# Altium PCB imprimir.PcbDoc (part 2 of 4)
Units mm, origin at the board's own origin, x right, y up, seen from the top; angles counter-clockwise.
Board outline 196.72 x 221.49 mm, 2 copper layers (Top Layer, Bottom Layer); 172 components, 0 nets, 904 pads, 232 vias.
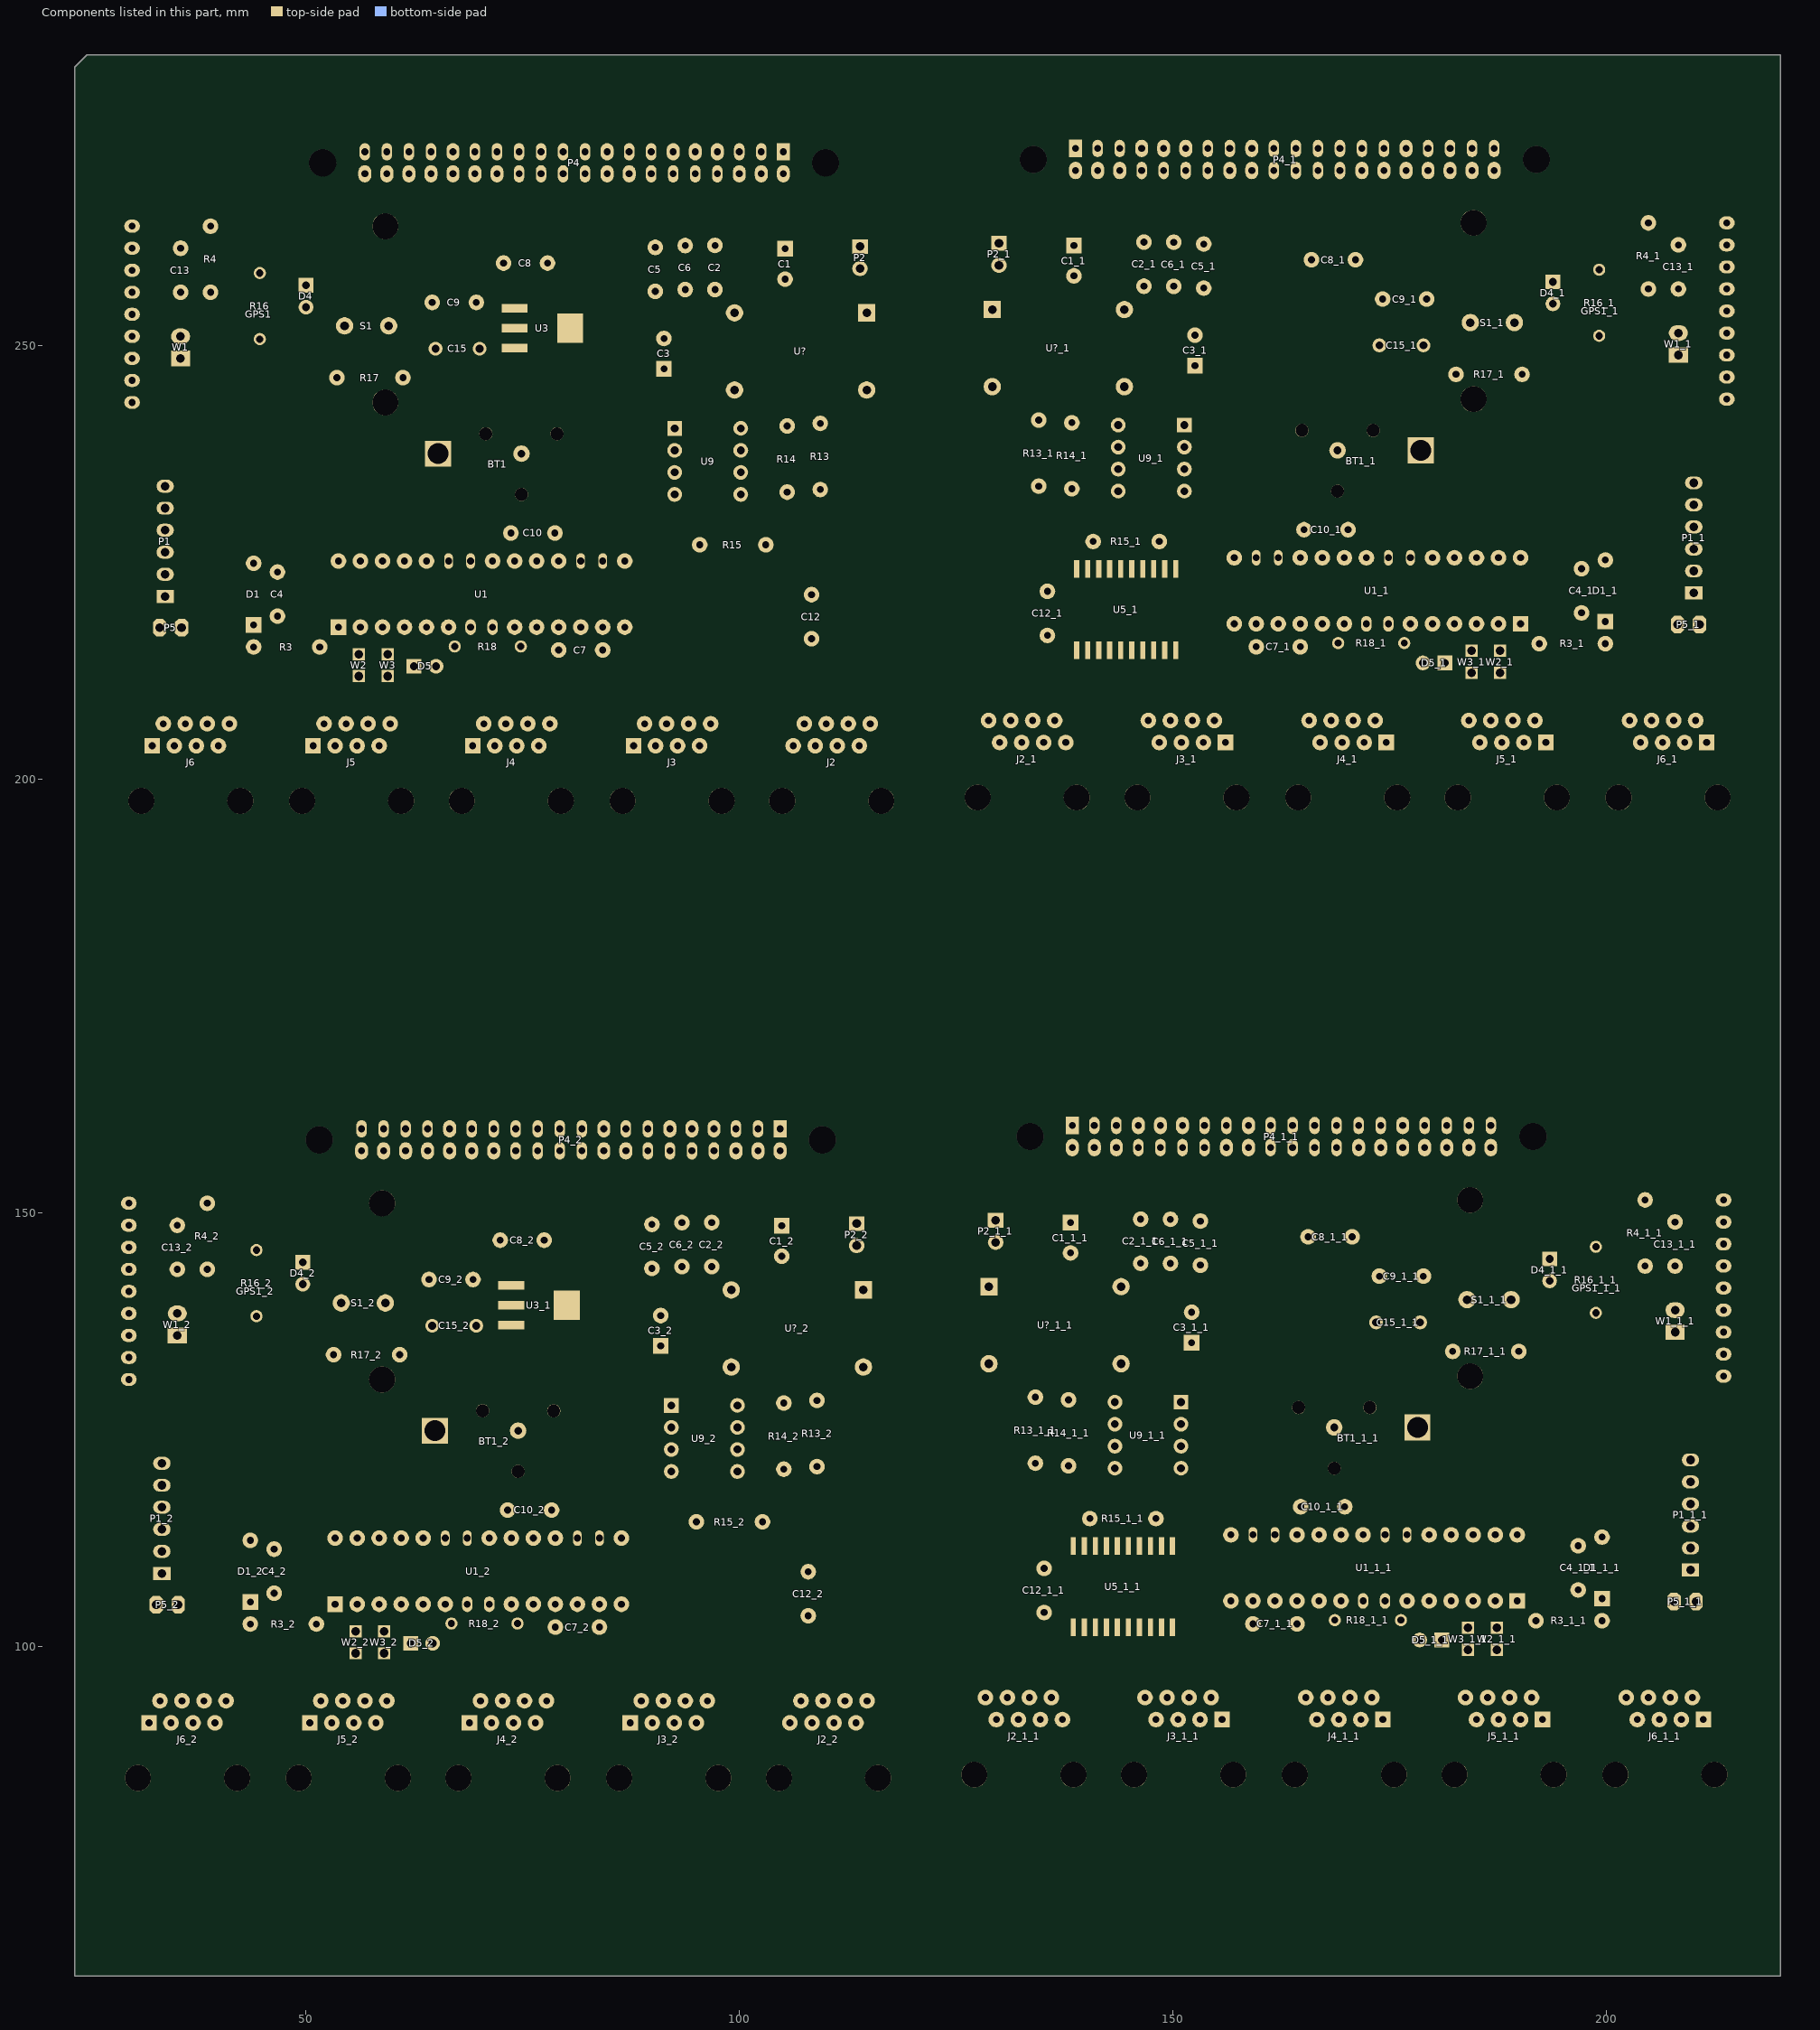
[diagram p2: the components of this part, seen from the top]

## Via types
v1: diameter 1.6, hole 0.6, Top Layer to Bottom Layer, 232 vias

## Nets (pads, with @x,y where several pads share a name; then routed paths per layer and width w, separated by ;. In a path a pad name is that pad's centre, name@x,y a point inside that pad or via, vN(x,y) a via of type N, cw(c..) or ccw(c..) an arc to the next point about the centre after c; other vN are vias at no path point) (continued)
copper on no net: (continued)
  Top Layer w0.025: 91.415,105.207 92.989,105.207 ; 91.415,105.232 92.989,105.232 ; 91.415,105.258 92.989,105.258 ; 91.415,105.283 92.989,105.283 ; 91.415,105.308 92.989,105.308 ; 91.415,105.334 92.989,105.334 ; 91.415,105.359 92.989,105.359 ; 91.415,105.385 92.989,105.385 ; 91.415,105.41 92.989,105.41 ; 91.415,105.435 92.989,105.435 ; 91.415,105.461 92.989,105.461 ; 91.415,105.486 91.618,105.486 ; 91.415,105.512 91.592,105.512 ; 91.415,105.537 91.592,105.537 ; 91.415,105.562 91.592,105.562 ; 91.415,105.588 91.592,105.588 ; 91.415,105.613 92.989,105.613 ; 91.415,105.639 91.923,105.639 ; 91.415,105.664 91.897,105.664 ; 91.415,109.347 91.44,109.347 ; 91.415,109.372 91.44,109.372 ; 91.415,109.398 91.44,109.398 ; 91.415,109.423 91.44,109.423 ; 91.415,109.449 91.465,109.449 ; 91.415,109.474 91.44,109.474 ; 91.415,109.499 91.44,109.499 ; 91.415,109.525 94.361,109.525 ; 91.415,109.55 94.361,109.55 ; 91.415,109.576 95.707,109.576 ; 91.415,109.601 95.707,109.601 ; 91.415,109.626 95.682,109.626 ; 91.415,109.652 95.656,109.652 ; 91.415,109.677 95.631,109.677 ; 91.415,109.703 95.606,109.703 ; 91.415,109.728 95.58,109.728 ; 91.415,109.753 95.555,109.753 ; 91.415,109.779 95.529,109.779 ; 91.415,109.804 95.504,109.804 ; 91.415,109.83 95.453,109.83 ; 91.415,109.855 95.428,109.855 ; 91.415,109.88 95.402,109.88 ; 91.415,109.906 95.352,109.906 ; 91.415,109.931 95.301,109.931 ; 91.415,109.957 95.25,109.957 ; 91.415,109.982 95.199,109.982 ; 91.415,110.007 95.148,110.007 ; 91.415,110.033 95.072,110.033 ; 91.415,110.058 94.996,110.058 ; 91.415,110.084 94.869,110.084 ; 91.415,110.109 94.793,110.109 ; 91.415,110.134 94.59,110.134 ; 91.415,110.16 94.386,110.16 ; 91.465,105.689 91.897,105.689 ; 91.491,105.715 91.923,105.715 ; 91.491,109.449 91.592,109.449 ; 91.491,109.474 91.592,109.474 ; 91.491,109.499 91.745,109.499 ; 91.516,105.74 91.923,105.74 ; 91.516,109.372 91.592,109.372 ; 91.516,109.398 91.592,109.398 ; 91.516,109.423 91.592,109.423 ; 91.567,105.766 91.897,105.766 ; 91.567,106.096 91.745,106.096 ; 91.567,106.121 91.77,106.121 ; 91.592,105.918 91.745,105.918 ; 91.592,105.943 91.745,105.943 ; 91.592,106.147 91.77,106.147 ; 91.618,105.588 92.989,105.588 ; 91.618,105.791 91.897,105.791 ; 91.618,106.07 91.745,106.07 ; 91.618,106.172 91.745,106.172 ; 91.618,109.423 91.719,109.423 ; 91.618,109.449 91.745,109.449 ; 91.618,109.474 91.745,109.474 ; 91.643,105.486 92.989,105.486 ; 91.643,105.512 92.989,105.512 ; 91.643,105.537 92.989,105.537 ; 91.643,105.562 92.989,105.562 ; 91.643,105.816 91.872,105.816 ; 91.643,105.842 91.745,105.842 ; 91.643,105.867 91.77,105.867 ; 91.643,105.893 91.77,105.893 ; 91.643,105.969 91.77,105.969 ; 91.643,105.994 91.77,105.994 ; 91.643,106.02 91.77,106.02 ; 91.643,106.045 91.745,106.045 ; 91.643,108.966 91.77,108.966 ; 91.643,108.991 91.77,108.991 ; 91.643,109.017 91.745,109.017 ; 91.643,109.042 91.745,109.042 ; 91.643,109.068 91.77,109.068 ; 91.643,109.093 91.77,109.093 ; 91.643,109.118 91.745,109.118 ; 91.643,109.144 91.745,109.144 ; 91.643,109.169 91.77,109.169 ; 91.643,109.195 91.77,109.195 ; 91.643,109.22 91.77,109.22 ; 91.643,109.245 91.77,109.245 ; 91.643,109.271 91.77,109.271 ; 91.643,109.296 91.745,109.296 ; 91.643,109.322 91.745,109.322 ; 91.643,109.347 92.532,109.347 ; 91.643,109.372 91.745,109.372 ; 91.643,109.398 91.719,109.398 ; 91.669,106.197 91.694,106.197 ; 91.669,108.915 91.694,108.915 ; 91.669,108.941 91.745,108.941 ; 91.77,105.842 91.821,105.842 ; 91.77,109.296 91.821,109.296 ; 91.77,109.322 91.872,109.322 ; 91.77,109.372 92.532,109.372 ; 91.77,109.398 92.532,109.398 ; 91.796,109.423 92.354,109.423 ; 91.796,109.449 92.354,109.449 ; 91.796,109.474 92.989,109.474 ; 91.796,109.499 93.37,109.499 ; 91.796,217.856 93.37,217.856 ; 91.796,217.881 93.37,217.881 ; 91.796,217.907 93.37,217.907 ; 91.796,217.932 93.37,217.932 ; 91.796,217.957 93.37,217.957 ; 91.796,217.983 93.37,217.983 ; 91.796,218.008 93.37,218.008 ; 91.796,218.034 93.37,218.034 ; 91.796,218.059 93.37,218.059 ; 91.796,218.084 93.37,218.084 ; 91.796,218.11 93.37,218.11 ; 91.796,218.135 91.999,218.135 ; 91.796,218.161 91.973,218.161 ; 91.796,218.186 91.973,218.186 ; 91.796,218.211 91.973,218.211 ; 91.796,218.237 91.973,218.237 ; 91.796,218.262 93.37,218.262 ; 91.796,218.288 92.304,218.288 ; 91.796,218.313 92.278,218.313 ; 91.796,221.996 91.821,221.996 ; 91.796,222.021 91.821,222.021 ; 91.796,222.047 91.821,222.047 ; 91.796,222.072 91.821,222.072 ; 91.796,222.098 91.846,222.098 ; 91.796,222.123 91.821,222.123 ; 91.796,222.148 91.821,222.148 ; 91.796,222.174 94.742,222.174 ; 91.796,222.199 94.742,222.199 ; 91.796,222.225 96.088,222.225 ; 91.796,222.25 96.088,222.25 ; 91.796,222.275 96.063,222.275 ; 91.796,222.301 96.037,222.301 ; 91.796,222.326 96.012,222.326 ; 91.796,222.352 95.987,222.352 ; 91.796,222.377 95.961,222.377 ; 91.796,222.402 95.936,222.402 ; 91.796,222.428 95.91,222.428 ; 91.796,222.453 95.885,222.453 ; 91.796,222.479 95.834,222.479 ; 91.796,222.504 95.809,222.504 ; 91.796,222.529 95.783,222.529 ; 91.796,222.555 95.733,222.555 ; 91.796,222.58 95.682,222.58 ; 91.796,222.606 95.631,222.606 ; 91.796,222.631 95.58,222.631 ; 91.796,222.656 95.529,222.656 ; 91.796,222.682 95.453,222.682 ; 91.796,222.707 95.377,222.707 ; 91.796,222.733 95.25,222.733 ; 91.796,222.758 95.174,222.758 ; 91.796,222.783 94.971,222.783 ; 91.796,222.809 94.767,222.809 ; 91.846,218.338 92.278,218.338 ; 91.872,218.364 92.304,218.364 ; 91.872,222.098 91.973,222.098 ; 91.872,222.123 91.973,222.123 ; 91.872,222.148 92.126,222.148 ; 91.897,109.296 92.532,109.296 ; 91.897,109.322 92.532,109.322 ; 91.897,218.389 92.304,218.389 ; 91.897,222.021 91.973,222.021 ; 91.897,222.047 91.973,222.047 ; 91.897,222.072 91.973,222.072 ; 91.923,109.271 92.024,109.271 ; 91.948,105.639 92.913,105.639 ; 91.948,105.664 92.532,105.664 ; 91.948,105.689 92.532,105.689 ; 91.948,105.715 92.532,105.715 ; 91.948,109.042 92.329,109.042 ; 91.948,109.068 92.329,109.068 ; 91.948,109.093 92.329,109.093 ; 91.948,218.415 92.278,218.415 ; 91.948,218.745 92.126,218.745 ; 91.948,218.77 92.151,218.77 ; 91.973,105.74 92.532,105.74 ; 91.973,218.567 92.126,218.567 ; 91.973,218.592 92.126,218.592 ; 91.973,218.796 92.151,218.796 ; 91.999,109.017 92.329,109.017 ; 91.999,218.237 93.37,218.237 ; 91.999,218.44 92.278,218.44 ; 91.999,218.719 92.126,218.719 ; 91.999,218.821 92.126,218.821 ; 91.999,222.072 92.1,222.072 ; 91.999,222.098 92.126,222.098 ; 91.999,222.123 92.126,222.123 ; 92.024,105.766 92.38,105.766 ; 92.024,108.991 92.329,108.991 ; 92.024,218.135 93.37,218.135 ; 92.024,218.161 93.37,218.161 ; 92.024,218.186 93.37,218.186 ; 92.024,218.211 93.37,218.211 ; 92.024,218.465 92.253,218.465 ; 92.024,218.491 92.126,218.491 ; 92.024,218.516 92.151,218.516 ; 92.024,218.542 92.151,218.542 ; 92.024,218.618 92.151,218.618 ; 92.024,218.643 92.151,218.643 ; 92.024,218.669 92.151,218.669 ; 92.024,218.694 92.126,218.694 ; 92.024,221.615 92.151,221.615 ; 92.024,221.64 92.151,221.64 ; 92.024,221.666 92.126,221.666 ; 92.024,221.691 92.126,221.691 ; 92.024,221.717 92.151,221.717 ; 92.024,221.742 92.151,221.742 ; 92.024,221.767 92.126,221.767 ; 92.024,221.793 92.126,221.793 ; 92.024,221.818 92.151,221.818 ; 92.024,221.844 92.151,221.844 ; 92.024,221.869 92.151,221.869 ; 92.024,221.894 92.151,221.894 ; 92.024,221.92 92.151,221.92 ; 92.024,221.945 92.126,221.945 ; 92.024,221.971 92.126,221.971 ; 92.024,221.996 92.913,221.996 ; 92.024,222.021 92.126,222.021 ; 92.024,222.047 92.1,222.047 ; 92.05,105.791 92.151,105.791 ; 92.05,108.966 92.329,108.966 ; 92.05,109.118 92.329,109.118 ; 92.05,109.144 92.431,109.144 ; 92.05,109.169 92.431,109.169 ; 92.05,109.195 92.405,109.195 ; 92.05,109.22 92.38,109.22 ; 92.05,109.245 92.761,109.245 ; 92.05,109.271 92.532,109.271 ; 92.05,218.846 92.075,218.846 ; 92.05,221.564 92.075,221.564 ; 92.05,221.59 92.126,221.59 ; 92.075,105.816 92.1,105.816 ; 92.075,108.941 92.329,108.941 ; 92.1,108.788 92.354,108.788 ; 92.126,108.763 92.202,108.763 ; 92.126,108.915 92.329,108.915 ; 92.151,108.814 92.354,108.814 ; 92.151,218.491 92.202,218.491 ; 92.151,221.945 92.202,221.945 ; 92.151,221.971 92.253,221.971 ; 92.151,222.021 92.913,222.021 ; 92.151,222.047 92.913,222.047 ; 92.177,105.791 92.354,105.791 ; 92.177,105.816 92.329,105.816 ; 92.177,105.842 92.354,105.842 ; 92.177,105.867 92.532,105.867 ; 92.177,105.893 92.532,105.893 ; 92.177,108.839 92.354,108.839 ; 92.177,108.864 92.329,108.864 ; 92.177,108.89 92.329,108.89 ; 92.177,222.072 92.735,222.072 ; 92.177,222.098 92.735,222.098 ; 92.177,222.123 93.37,222.123 ; 92.177,222.148 93.751,222.148 ; 92.202,105.918 92.253,105.918 ; 92.202,108.712 92.329,108.712 ; 92.202,108.737 92.329,108.737 ; 92.227,108.687 92.304,108.687 ; 92.227,108.763 92.354,108.763 ; 92.253,108.661 92.278,108.661 ; 92.278,105.918 92.405,105.918 ; 92.278,221.945 92.913,221.945 ; 92.278,221.971 92.913,221.971 ; 92.304,105.943 92.405,105.943 ; 92.304,221.92 92.405,221.92 ; 92.329,218.288 93.294,218.288 ; 92.329,218.313 92.913,218.313 ; 92.329,218.338 92.913,218.338 ; 92.329,218.364 92.913,218.364 ; 92.329,221.691 92.71,221.691 ; 92.329,221.717 92.71,221.717 ; 92.329,221.742 92.71,221.742 ; 92.354,218.389 92.913,218.389 ; 92.38,105.842 92.405,105.842 ; 92.38,109.118 92.431,109.118 ; 92.38,221.666 92.71,221.666 ; 92.405,105.766 92.532,105.766 ; 92.405,109.423 92.507,109.423 ; 92.405,109.449 92.507,109.449 ; 92.405,218.415 92.761,218.415 ; 92.405,221.64 92.71,221.64 ; 92.431,105.791 92.532,105.791 ; 92.431,105.816 92.532,105.816 ; 92.431,105.842 92.532,105.842 ; 92.431,105.918 92.532,105.918 ; 92.431,105.943 92.532,105.943 ; 92.431,105.969 92.532,105.969 ; 92.431,105.994 92.532,105.994 ; 92.431,106.02 92.532,106.02 ; 92.431,109.22 92.532,109.22 ; 92.431,218.44 92.532,218.44 ; 92.431,221.615 92.71,221.615 ; 92.431,221.767 92.71,221.767 ; 92.431,221.793 92.812,221.793 ; 92.431,221.818 92.812,221.818 ; 92.431,221.844 92.786,221.844 ; 92.431,221.869 92.761,221.869 ; 92.431,221.894 93.142,221.894 ; 92.431,221.92 92.913,221.92 ; 92.456,106.045 92.532,106.045 ; 92.456,106.07 92.532,106.07 ; 92.456,109.195 92.507,109.195 ; 92.456,218.465 92.481,218.465 ; 92.456,221.59 92.71,221.59 ; 92.481,106.096 92.532,106.096 ; 92.481,106.121 92.532,106.121 ; 92.481,221.437 92.735,221.437 ; 92.507,221.412 92.583,221.412 ; 92.507,221.564 92.71,221.564 ; 92.532,221.463 92.735,221.463 ; 92.558,105.664 92.913,105.664 ; 92.558,108.61 92.659,108.61 ; 92.558,108.636 92.685,108.636 ; 92.558,108.661 92.685,108.661 ; 92.558,108.687 92.71,108.687 ; 92.558,108.763 92.71,108.763 ; 92.558,108.788 92.71,108.788 ; 92.558,109.271 92.786,109.271 ; 92.558,109.296 92.786,109.296 ; 92.558,109.322 92.812,109.322 ; 92.558,109.347 92.837,109.347 ; 92.558,109.372 92.862,109.372 ; 92.558,109.398 92.862,109.398 ; 92.558,109.423 92.862,109.423 ; 92.558,109.449 92.989,109.449 ; 92.558,218.44 92.735,218.44 ; 92.558,218.465 92.71,218.465 ; 92.558,218.491 92.735,218.491 ; 92.558,218.516 92.913,218.516 ; 92.558,218.542 92.913,218.542 ; 92.558,221.488 92.735,221.488 ; 92.558,221.513 92.71,221.513 ; 92.558,221.539 92.71,221.539 ; 92.583,105.689 92.913,105.689 ; 92.583,105.715 92.888,105.715 ; 92.583,108.712 92.71,108.712 ; 92.583,108.737 92.71,108.737 ; 92.583,108.814 92.735,108.814 ; 92.583,108.839 92.735,108.839 ; 92.583,108.864 92.735,108.864 ; 92.583,108.89 92.735,108.89 ; 92.583,108.915 92.735,108.915 ; 92.583,109.042 92.735,109.042 ; 92.583,109.068 92.735,109.068 ; 92.583,109.093 92.735,109.093 ; 92.583,109.118 92.735,109.118 ; 92.583,109.144 92.735,109.144 ; 92.583,109.169 92.735,109.169 ; 92.583,109.195 92.761,109.195 ; 92.583,109.22 92.761,109.22 ; 92.583,218.567 92.634,218.567 ; 92.583,221.361 92.71,221.361 ; 92.583,221.386 92.71,221.386 ; 92.608,105.74 92.913,105.74 ; 92.608,105.766 92.913,105.766 ; 92.608,105.791 92.913,105.791 ; 92.608,105.816 92.913,105.816 ; 92.608,105.842 92.913,105.842 ; 92.608,105.867 92.735,105.867 ; 92.608,105.893 92.735,105.893 ; 92.608,105.918 92.761,105.918 ; 92.608,105.943 92.761,105.943 ; 92.608,105.969 92.761,105.969 ; 92.608,105.994 92.761,105.994 ; 92.608,108.941 92.735,108.941 ; 92.608,108.966 92.735,108.966 ; 92.608,108.991 92.735,108.991 ; 92.608,109.017 92.735,109.017 ; 92.608,221.336 92.685,221.336 ; 92.608,221.412 92.735,221.412 ; 92.634,106.02 92.761,106.02 ; 92.634,106.045 92.735,106.045 ; 92.634,221.31 92.659,221.31 ; 92.659,218.567 92.786,218.567 ; 92.685,218.592 92.786,218.592 ; 92.761,105.867 92.913,105.867 ; 92.761,105.893 92.888,105.893 ; 92.761,218.491 92.786,218.491 ; 92.761,221.767 92.812,221.767 ; 92.786,105.918 92.862,105.918 ; 92.786,105.943 92.862,105.943 ; 92.786,218.415 92.913,218.415 ; 92.786,222.072 92.888,222.072 ; 92.786,222.098 92.888,222.098 ; 92.812,218.44 92.913,218.44 ; 92.812,218.465 92.913,218.465 ; 92.812,218.491 92.913,218.491 ; 92.812,218.567 92.913,218.567 ; 92.812,218.592 92.913,218.592 ; 92.812,218.618 92.913,218.618 ; 92.812,218.643 92.913,218.643 ; 92.812,218.669 92.913,218.669 ; 92.812,221.869 92.913,221.869 ; 92.837,218.694 92.913,218.694 ; 92.837,218.719 92.913,218.719 ; 92.837,221.844 92.888,221.844 ; 92.862,218.745 92.913,218.745 ; 92.862,218.77 92.913,218.77 ; 92.888,109.423 92.964,109.423 ; 92.939,218.313 93.294,218.313 ; 92.939,221.259 93.04,221.259 ; 92.939,221.285 93.066,221.285 ; 92.939,221.31 93.066,221.31 ; 92.939,221.336 93.091,221.336 ; 92.939,221.412 93.091,221.412 ; 92.939,221.437 93.091,221.437 ; 92.939,221.92 93.167,221.92 ; 92.939,221.945 93.167,221.945 ; 92.939,221.971 93.193,221.971 ; 92.939,221.996 93.218,221.996 ; 92.939,222.021 93.243,222.021 ; 92.939,222.047 93.243,222.047 ; 92.939,222.072 93.243,222.072 ; 92.939,222.098 93.37,222.098 ; 92.964,218.338 93.294,218.338 ; 92.964,218.364 93.269,218.364 ; 92.964,221.361 93.091,221.361 ; 92.964,221.386 93.091,221.386 ; 92.964,221.463 93.116,221.463 ; 92.964,221.488 93.116,221.488 ; 92.964,221.513 93.116,221.513 ; 92.964,221.539 93.116,221.539 ; 92.964,221.564 93.116,221.564 ; 92.964,221.691 93.116,221.691 ; 92.964,221.717 93.116,221.717 ; 92.964,221.742 93.116,221.742 ; 92.964,221.767 93.116,221.767 ; 92.964,221.793 93.116,221.793 ; 92.964,221.818 93.116,221.818 ; 92.964,221.844 93.142,221.844 ; 92.964,221.869 93.142,221.869 ; 92.989,108.026 93.929,108.026 ; 92.989,108.052 94.107,108.052 ; 92.989,108.077 94.183,108.077 ; 92.989,108.102 94.234,108.102 ; 92.989,108.128 94.285,108.128 ; 92.989,108.153 94.31,108.153 ; 92.989,108.179 94.336,108.179 ; 92.989,108.204 94.361,108.204 ; 92.989,108.229 94.386,108.229 ; 92.989,108.255 94.412,108.255 ; 92.989,108.28 94.412,108.28 ; 92.989,108.306 94.412,108.306 ; 92.989,108.331 94.437,108.331 ; 92.989,108.356 94.437,108.356 ; 92.989,108.382 94.209,108.382 ; 92.989,108.407 94.183,108.407 ; 92.989,108.433 94.158,108.433 ; 92.989,108.458 94.158,108.458 ; 92.989,108.483 94.158,108.483 ; 92.989,108.509 94.158,108.509 ; 92.989,108.534 94.158,108.534 ; 92.989,108.56 94.158,108.56 ; 92.989,108.585 94.158,108.585 ; 92.989,108.61 94.158,108.61 ; 92.989,108.636 94.158,108.636 ; 92.989,108.661 94.031,108.661 ; 92.989,108.687 94.005,108.687 ; 92.989,108.712 94.005,108.712 ; 92.989,108.737 94.005,108.737 ; 92.989,108.763 94.005,108.763 ; 92.989,108.788 94.005,108.788 ; 92.989,108.814 94.005,108.814 ; 92.989,108.839 94.005,108.839 ; 92.989,108.864 94.005,108.864 ; 92.989,108.89 94.031,108.89 ; 92.989,108.915 94.031,108.915 ; 92.989,108.941 94.005,108.941 ; 92.989,108.966 94.259,108.966 ; 92.989,218.389 93.294,218.389 ; 92.989,218.415 93.294,218.415 ; 92.989,218.44 93.294,218.44 ; 92.989,218.465 93.294,218.465 ; 92.989,218.491 93.294,218.491 ; 92.989,218.516 93.116,218.516 ; 92.989,218.542 93.116,218.542 ; 92.989,218.567 93.142,218.567 ; 92.989,218.592 93.142,218.592 ; 92.989,218.618 93.142,218.618 ; 92.989,218.643 93.142,218.643 ; 92.989,221.59 93.116,221.59 ; 92.989,221.615 93.116,221.615 ; 92.989,221.64 93.116,221.64 ; 92.989,221.666 93.116,221.666 ; 93.015,109.449 93.32,109.449 ; 93.015,109.474 93.37,109.474 ; 93.015,218.669 93.142,218.669 ; 93.015,218.694 93.116,218.694 ; 93.04,109.372 93.294,109.372 ; 93.04,109.398 93.294,109.398 ; 93.04,109.423 93.32,109.423 ; 93.066,109.347 93.269,109.347 ; 93.142,218.516 93.294,218.516 ; 93.142,218.542 93.269,218.542 ; 93.167,109.296 93.218,109.296 ; 93.167,109.322 93.243,109.322 ; 93.167,218.567 93.243,218.567 ; 93.167,218.592 93.243,218.592 ; 93.269,222.072 93.345,222.072 ; 93.37,220.675 94.31,220.675 ; 93.37,220.701 94.488,220.701 ; 93.37,220.726 94.564,220.726 ; 93.37,220.751 94.615,220.751 ; 93.37,220.777 94.666,220.777 ; 93.37,220.802 94.691,220.802 ; 93.37,220.828 94.717,220.828 ; 93.37,220.853 94.742,220.853 ; 93.37,220.878 94.767,220.878 ; 93.37,220.904 94.793,220.904 ; 93.37,220.929 94.793,220.929 ; 93.37,220.955 94.793,220.955 ; 93.37,220.98 94.818,220.98 ; 93.37,221.005 94.818,221.005 ; 93.37,221.031 94.59,221.031 ; 93.37,221.056 94.564,221.056 ; 93.37,221.082 94.539,221.082 ; 93.37,221.107 94.539,221.107 ; 93.37,221.132 94.539,221.132 ; 93.37,221.158 94.539,221.158 ; 93.37,221.183 94.539,221.183 ; 93.37,221.209 94.539,221.209 ; 93.37,221.234 94.539,221.234 ; 93.37,221.259 94.539,221.259 ; 93.37,221.285 94.539,221.285 ; 93.37,221.31 94.412,221.31 ; 93.37,221.336 94.386,221.336 ; 93.37,221.361 94.386,221.361 ; 93.37,221.386 94.386,221.386 ; 93.37,221.412 94.386,221.412 ; 93.37,221.437 94.386,221.437 ; 93.37,221.463 94.386,221.463 ; 93.37,221.488 94.386,221.488 ; 93.37,221.513 94.386,221.513 ; 93.37,221.539 94.412,221.539 ; 93.37,221.564 94.412,221.564 ; 93.37,221.59 94.386,221.59 ; 93.37,221.615 94.64,221.615 ; 93.396,222.098 93.701,222.098 ; 93.396,222.123 93.751,222.123 ; 93.421,222.021 93.675,222.021 ; 93.421,222.047 93.675,222.047 ; 93.421,222.072 93.701,222.072 ; 93.447,221.996 93.65,221.996 ; 93.548,109.372 93.98,109.372 ; 93.548,109.474 93.599,109.474 ; 93.548,109.499 93.624,109.499 ; 93.548,221.945 93.599,221.945 ; 93.548,221.971 93.624,221.971 ; 93.574,109.398 94.005,109.398 ; 93.599,109.347 93.751,109.347 ; 93.599,109.423 94.361,109.423 ; 93.624,109.449 94.361,109.449 ; 93.65,109.474 94.361,109.474 ; 93.65,109.499 94.361,109.499 ; 93.675,109.296 93.726,109.296 ; 93.675,109.322 93.726,109.322 ; 93.777,109.322 93.955,109.322 ; 93.777,109.347 93.955,109.347 ; 93.802,109.271 93.98,109.271 ; 93.802,109.296 93.98,109.296 ; 93.828,109.245 93.929,109.245 ; 93.929,222.021 94.361,222.021 ; 93.929,222.123 93.98,222.123 ; 93.929,222.148 94.005,222.148 ; 93.955,222.047 94.386,222.047 ; 93.98,109.22 94.285,109.22 ; 93.98,221.996 94.132,221.996 ; 93.98,222.072 94.742,222.072 ; 94.005,108.991 94.259,108.991 ; 94.005,109.017 94.259,109.017 ; 94.005,109.144 94.259,109.144 ; 94.005,109.195 94.285,109.195 ; 94.005,109.245 94.259,109.245 ; 94.005,109.347 94.285,109.347 ; 94.005,222.098 94.742,222.098 ; 94.031,109.042 94.132,109.042 ; 94.031,109.068 94.132,109.068 ; 94.031,109.093 94.259,109.093 ; 94.031,109.118 94.259,109.118 ; 94.031,109.169 94.259,109.169 ; 94.031,109.271 94.767,109.271 ; 94.031,109.296 94.793,109.296 ; 94.031,109.322 94.361,109.322 ; 94.031,109.372 94.336,109.372 ; 94.031,109.398 94.336,109.398 ; 94.031,222.123 94.742,222.123 ; 94.031,222.148 94.742,222.148 ; 94.056,108.661 94.183,108.661 ; 94.056,221.945 94.107,221.945 ; 94.056,221.971 94.107,221.971 ; 94.082,108.687 94.183,108.687 ; 94.082,108.712 94.183,108.712 ; 94.082,108.941 94.259,108.941 ; 94.107,108.737 94.183,108.737 ; 94.132,108.763 94.183,108.763 ; 94.158,109.042 94.259,109.042 ; 94.158,109.068 94.259,109.068 ; 94.158,221.971 94.336,221.971 ; 94.158,221.996 94.336,221.996 ; 94.183,108.915 94.259,108.915 ; 94.183,221.92 94.361,221.92 ; 94.183,221.945 94.361,221.945 ; 94.209,221.894 94.31,221.894 ; 94.234,108.89 94.259,108.89 ; 94.259,108.382 94.437,108.382 ; 94.259,108.712 94.412,108.712 ; 94.259,108.737 94.412,108.737 ; 94.259,108.763 94.386,108.763 ; 94.259,108.788 94.361,108.788 ; 94.259,108.814 94.361,108.814 ; 94.259,108.839 94.336,108.839 ; 94.259,108.864 94.31,108.864 ; 94.285,108.407 94.463,108.407 ; 94.285,108.433 94.463,108.433 ; 94.285,108.458 94.463,108.458 ; 94.285,108.483 94.463,108.483 ; 94.285,108.509 94.463,108.509 ; 94.285,108.534 94.463,108.534 ; 94.285,108.56 94.463,108.56 ; 94.285,108.585 94.463,108.585 ; 94.285,108.61 94.463,108.61 ; 94.285,108.636 94.437,108.636 ; 94.285,108.661 94.437,108.661 ; 94.285,108.687 94.437,108.687 ; 94.31,109.245 94.767,109.245 ; 94.31,109.347 94.336,109.347 ; 94.361,221.869 94.666,221.869 ; 94.386,109.423 95.834,109.423 ; 94.386,109.449 95.809,109.449 ; 94.386,109.55 95.733,109.55 ; 94.386,221.64 94.64,221.64 ; 94.386,221.666 94.64,221.666 ; 94.386,221.793 94.64,221.793 ; 94.386,221.844 94.666,221.844 ; 94.386,221.894 94.64,221.894 ; 94.386,221.996 94.666,221.996 ; 94.412,105.664 95.987,105.664 ; 94.412,105.689 95.987,105.689 ; 94.412,105.715 94.996,105.715 ; 94.412,105.74 94.945,105.74 ; 94.412,105.766 94.818,105.766 ; 94.412,105.791 94.844,105.791 ; 94.412,105.816 94.793,105.816 ; 94.412,106.401 94.539,106.401 ; 94.412,106.426 94.539,106.426 ; 94.412,106.451 94.539,106.451 ; 94.412,106.477 94.539,106.477 ; 94.412,106.502 94.513,106.502 ; 94.412,106.528 94.513,106.528 ; 94.412,109.398 95.834,109.398 ; 94.412,109.474 95.783,109.474 ; 94.412,109.525 94.463,109.525 ; 94.412,221.691 94.513,221.691 ; 94.412,221.717 94.513,221.717 ; 94.412,221.742 94.64,221.742 ; 94.412,221.767 94.64,221.767 ; 94.412,221.818 94.64,221.818 ; 94.412,221.92 95.148,221.92 ; 94.412,221.945 95.174,221.945 ; 94.412,221.971 94.742,221.971 ; 94.412,222.021 94.717,222.021 ; 94.412,222.047 94.717,222.047 ; 94.437,105.435 96.012,105.435 ; 94.437,105.461 96.012,105.461 ; 94.437,105.486 96.012,105.486 ; 94.437,105.512 95.987,105.512 ; 94.437,105.537 95.987,105.537 ; 94.437,105.562 95.987,105.562 ; 94.437,105.588 95.987,105.588 ; 94.437,105.613 95.987,105.613 ; 94.437,105.639 95.987,105.639 ; 94.437,106.375 94.539,106.375 ; 94.437,106.553 94.513,106.553 ; 94.437,109.322 94.818,109.322 ; 94.437,109.372 95.834,109.372 ; 94.437,221.31 94.564,221.31 ; 94.463,105.283 96.139,105.283 ; 94.463,105.308 96.139,105.308 ; 94.463,105.334 96.139,105.334 ; 94.463,105.359 96.114,105.359 ; 94.463,105.385 96.037,105.385 ; 94.463,105.41 96.012,105.41 ; 94.463,105.842 94.767,105.842 ; 94.463,105.867 94.742,105.867 ; 94.463,105.893 94.717,105.893 ; 94.463,105.918 94.539,105.918 ; 94.463,105.943 94.539,105.943 ; 94.463,105.969 94.539,105.969 ; 94.463,105.994 94.539,105.994 ; 94.463,106.02 94.539,106.02 ; 94.463,106.045 94.539,106.045 ; 94.463,106.07 94.539,106.07 ; 94.463,106.096 94.539,106.096 ; 94.463,106.121 94.564,106.121 ; 94.463,106.147 94.564,106.147 ; 94.463,106.172 94.564,106.172 ; 94.463,106.197 94.564,106.197 ; 94.463,106.223 94.564,106.223 ; 94.463,106.248 94.564,106.248 ; 94.463,106.274 94.564,106.274 ; 94.463,106.299 94.564,106.299 ; 94.463,106.324 94.539,106.324 ; 94.463,106.35 94.539,106.35 ; 94.463,109.347 95.86,109.347 ; 94.463,221.336 94.564,221.336 ; 94.463,221.361 94.564,221.361 ; 94.463,221.59 94.64,221.59 ; 94.488,105.207 96.139,105.207 ; 94.488,105.232 96.139,105.232 ; 94.488,105.258 96.139,105.258 ; 94.488,108.941 94.767,108.941 ; 94.488,108.966 94.767,108.966 ; 94.488,108.991 94.767,108.991 ; 94.488,109.017 94.793,109.017 ; 94.488,221.386 94.564,221.386 ; 94.513,108.763 94.59,108.763 ; 94.513,108.788 94.615,108.788 ; 94.513,108.814 94.615,108.814 ; 94.513,108.839 94.767,108.839 ; 94.513,108.864 94.767,108.864 ; 94.513,108.89 94.767,108.89 ; 94.513,108.915 94.767,108.915 ; 94.513,109.042 94.793,109.042 ; 94.513,109.068 94.793,109.068 ; 94.513,109.093 94.767,109.093 ; 94.513,109.118 94.767,109.118 ; 94.513,109.144 94.767,109.144 ; 94.513,109.169 94.767,109.169 ; 94.513,109.195 94.767,109.195 ; 94.513,109.22 94.767,109.22 ; 94.513,109.499 95.783,109.499 ; 94.513,109.525 95.758,109.525 ; 94.513,221.412 94.564,221.412 ; 94.539,108.737 94.564,108.737 ; 94.539,221.691 94.64,221.691 ; 94.539,221.717 94.64,221.717 ; 94.564,105.918 94.717,105.918 ; 94.564,105.943 94.717,105.943 ; 94.564,105.969 94.717,105.969 ; 94.564,221.564 94.64,221.564 ; 94.59,105.994 94.767,105.994 ; 94.59,106.02 94.818,106.02 ; 94.59,106.045 94.844,106.045 ; 94.615,106.07 94.818,106.07 ; 94.615,106.096 94.793,106.096 ; 94.615,106.121 94.767,106.121 ; 94.615,221.539 94.64,221.539 ; 94.64,106.147 94.717,106.147 ; 94.64,106.172 94.717,106.172 ; 94.64,106.197 94.717,106.197 ; 94.64,106.223 94.717,106.223 ; 94.64,108.712 94.767,108.712 ; 94.64,108.737 94.767,108.737 ; 94.64,108.763 94.767,108.763 ; 94.64,108.788 94.767,108.788 ; 94.64,108.814 94.767,108.814 ; 94.64,221.031 94.818,221.031 ; 94.64,221.361 94.793,221.361 ; 94.64,221.386 94.793,221.386 ; 94.64,221.412 94.767,221.412 ; 94.64,221.437 94.742,221.437 ; 94.64,221.463 94.742,221.463 ; 94.64,221.488 94.717,221.488 ; 94.64,221.513 94.691,221.513 ; 94.666,106.248 94.717,106.248 ; 94.666,106.274 94.691,106.274 ; 94.666,108.102 94.717,108.102 ; 94.666,108.128 94.717,108.128 ; 94.666,108.153 94.717,108.153 ; 94.666,108.179 94.742,108.179 ; 94.666,108.204 94.742,108.204 ; 94.666,108.229 94.742,108.229 ; 94.666,108.255 94.742,108.255 ; 94.666,108.28 94.767,108.28 ; 94.666,108.306 94.767,108.306 ; 94.666,108.331 94.767,108.331 ; 94.666,108.356 94.767,108.356 ; 94.666,108.382 94.793,108.382 ; 94.666,108.407 94.793,108.407 ; 94.666,108.433 94.793,108.433 ; 94.666,108.458 94.793,108.458 ; 94.666,108.483 94.793,108.483 ; 94.666,108.509 94.793,108.509 ; 94.666,108.534 94.793,108.534 ; 94.666,108.56 94.793,108.56 ; 94.666,108.585 94.793,108.585 ; 94.666,108.61 94.793,108.61 ; 94.666,108.636 94.793,108.636 ; 94.666,108.661 94.793,108.661 ; 94.666,108.687 94.767,108.687 ; 94.666,221.056 94.844,221.056 ; 94.666,221.082 94.844,221.082 ; 94.666,221.107 94.844,221.107 ; 94.666,221.132 94.844,221.132 ; 94.666,221.158 94.844,221.158 ; 94.666,221.183 94.844,221.183 ; 94.666,221.209 94.844,221.209 ; 94.666,221.234 94.844,221.234 ; 94.666,221.259 94.844,221.259 ; 94.666,221.285 94.818,221.285 ; 94.666,221.31 94.818,221.31 ; 94.666,221.336 94.818,221.336 ; 94.691,108.077 94.717,108.077 ; 94.691,221.894 95.148,221.894 ; 94.691,221.996 94.717,221.996 ; 94.767,222.072 96.215,222.072 ; 94.767,222.098 96.19,222.098 ; 94.767,222.199 96.114,222.199 ; 94.793,108.839 95.961,108.839 ; 94.793,108.864 95.961,108.864 ; 94.793,108.89 95.961,108.89 ; 94.793,108.915 95.961,108.915 ; 94.793,218.313 96.368,218.313 ; 94.793,218.338 96.368,218.338 ; 94.793,218.364 95.377,218.364 ; 94.793,218.389 95.326,218.389 ; 94.793,218.415 95.199,218.415 ; 94.793,218.44 95.225,218.44 ; 94.793,218.465 95.174,218.465 ; 94.793,219.05 94.92,219.05 ; 94.793,219.075 94.92,219.075 ; 94.793,219.1 94.92,219.1 ; 94.793,219.126 94.92,219.126 ; 94.793,219.151 94.894,219.151 ; 94.793,219.177 94.894,219.177 ; 94.793,222.047 96.215,222.047 ; 94.793,222.123 96.164,222.123 ; 94.793,222.174 94.844,222.174 ; 94.818,108.814 95.453,108.814 ; 94.818,108.941 95.961,108.941 ; 94.818,109.245 95.91,109.245 ; 94.818,218.084 96.393,218.084 ; 94.818,218.11 96.393,218.11 ; 94.818,218.135 96.393,218.135 ; 94.818,218.161 96.368,218.161 ; 94.818,218.186 96.368,218.186 ; 94.818,218.211 96.368,218.211 ; 94.818,218.237 96.368,218.237 ; 94.818,218.262 96.368,218.262 ; 94.818,218.288 96.368,218.288 ; 94.818,219.024 94.92,219.024 ; 94.818,219.202 94.894,219.202 ; 94.818,221.971 95.199,221.971 ; 94.818,222.021 96.215,222.021 ; 94.844,108.636 95.402,108.636 ; 94.844,108.661 95.402,108.661 ; 94.844,108.788 95.428,108.788 ; 94.844,109.271 95.885,109.271 ; 94.844,109.296 95.885,109.296 ; 94.844,109.322 95.86,109.322 ; 94.844,217.932 96.52,217.932 ; 94.844,217.957 96.52,217.957 ; 94.844,217.983 96.52,217.983 ; 94.844,218.008 96.495,218.008 ; 94.844,218.034 96.418,218.034 ; 94.844,218.059 96.393,218.059 ; 94.844,218.491 95.148,218.491 ; 94.844,218.516 95.123,218.516 ; 94.844,218.542 95.098,218.542 ; 94.844,218.567 94.92,218.567 ; 94.844,218.592 94.92,218.592 ; 94.844,218.618 94.92,218.618 ; 94.844,218.643 94.92,218.643 ; 94.844,218.669 94.92,218.669 ; 94.844,218.694 94.92,218.694 ; 94.844,218.719 94.92,218.719 ; 94.844,218.745 94.92,218.745 ; 94.844,218.77 94.945,218.77 ; 94.844,218.796 94.945,218.796 ; 94.844,218.821 94.945,218.821 ; 94.844,218.846 94.945,218.846 ; 94.844,218.872 94.945,218.872 ; 94.844,218.897 94.945,218.897 ; 94.844,218.923 94.945,218.923 ; 94.844,218.948 94.945,218.948 ; 94.844,218.973 94.92,218.973 ; 94.844,218.999 94.92,218.999 ; 94.844,221.996 96.241,221.996 ; 94.869,108.61 95.402,108.61 ; 94.869,108.763 95.402,108.763 ; 94.869,108.966 95.961,108.966 ; 94.869,109.22 95.91,109.22 ; 94.869,217.856 96.52,217.856 ; 94.869,217.881 96.52,217.881 ; 94.869,217.907 96.52,217.907 ; 94.869,221.59 95.148,221.59 ; 94.869,221.615 95.148,221.615 ; 94.869,221.64 95.148,221.64 ; 94.869,221.666 95.174,221.666 ; 94.894,108.585 95.428,108.585 ; 94.894,108.687 95.402,108.687 ; 94.894,108.991 95.961,108.991 ; 94.894,109.017 95.961,109.017 ; 94.894,109.042 95.961,109.042 ; 94.894,109.068 95.936,109.068 ; 94.894,109.169 95.91,109.169 ; 94.894,109.195 95.91,109.195 ; 94.894,221.412 94.971,221.412 ; 94.894,221.437 94.996,221.437 ; 94.894,221.463 94.996,221.463 ; 94.894,221.488 95.148,221.488 ; 94.894,221.513 95.148,221.513 ; 94.894,221.539 95.148,221.539 ; 94.894,221.564 95.148,221.564 ; 94.894,221.691 95.174,221.691 ; 94.894,221.717 95.174,221.717 ; 94.894,221.742 95.148,221.742 ; 94.894,221.767 95.148,221.767 ; 94.894,221.793 95.148,221.793 ; 94.894,221.818 95.148,221.818 ; 94.894,221.844 95.148,221.844 ; 94.894,221.869 95.148,221.869 ; 94.894,222.148 96.164,222.148 ; 94.894,222.174 96.139,222.174 ; 94.92,108.56 95.428,108.56 ; 94.92,108.712 95.402,108.712 ; 94.92,108.737 95.402,108.737 ; 94.92,109.093 95.936,109.093 ; 94.92,109.118 95.936,109.118 ; 94.92,109.144 95.936,109.144 ; 94.92,221.386 94.945,221.386 ; 94.945,108.509 95.631,108.509 ; 94.945,108.534 95.631,108.534 ; 94.945,218.567 95.098,218.567 ; 94.945,218.592 95.098,218.592 ; 94.945,218.618 95.098,218.618 ; 94.971,108.483 95.402,108.483 ; 94.971,218.643 95.148,218.643 ; 94.971,218.669 95.199,218.669 ; 94.971,218.694 95.225,218.694 ; 94.996,108.407 95.301,108.407 ; 94.996,108.433 95.199,108.433 ; 94.996,108.458 95.174,108.458 ; 94.996,218.719 95.199,218.719 ; 94.996,218.745 95.174,218.745 ; 94.996,218.77 95.148,218.77 ; 95.021,105.715 95.479,105.715 ; 95.021,105.74 95.479,105.74 ; 95.021,108.001 95.072,108.001 ; 95.021,108.026 95.072,108.026 ; 95.021,108.052 95.098,108.052 ; 95.021,108.077 95.098,108.077 ; 95.021,108.102 95.123,108.102 ; 95.021,108.306 95.199,108.306 ; 95.021,108.331 95.174,108.331 ; 95.021,108.356 95.174,108.356 ; 95.021,108.382 95.199,108.382 ; 95.021,218.796 95.098,218.796 ; 95.021,218.821 95.098,218.821 ; 95.021,218.846 95.098,218.846 ; 95.021,218.872 95.098,218.872 ; 95.021,221.361 95.148,221.361 ; 95.021,221.386 95.148,221.386 ; 95.021,221.412 95.148,221.412 ; 95.021,221.437 95.148,221.437 ; 95.021,221.463 95.148,221.463 ; 95.047,105.766 95.987,105.766 ; 95.047,105.791 95.479,105.791 ; 95.047,105.816 95.479,105.816 ; 95.047,106.197 95.479,106.197 ; 95.047,106.223 95.479,106.223 ; 95.047,106.324 95.479,106.324 ; 95.047,106.35 95.479,106.35 ; 95.047,106.375 95.479,106.375 ; 95.047,106.401 95.479,106.401 ; 95.047,106.426 95.225,106.426 ; 95.047,106.451 95.225,106.451 ; 95.047,108.128 95.123,108.128 ; 95.047,108.153 95.174,108.153 ; 95.047,108.179 95.225,108.179 ; 95.047,108.204 95.25,108.204 ; 95.047,108.229 95.275,108.229 ; 95.047,108.255 95.301,108.255 ; 95.047,108.28 95.301,108.28 ; 95.047,218.897 95.098,218.897 ; 95.047,218.923 95.072,218.923 ; 95.047,220.751 95.098,220.751 ; 95.047,220.777 95.098,220.777 ; 95.047,220.802 95.098,220.802 ; 95.047,220.828 95.123,220.828 ; 95.047,220.853 95.123,220.853 ; 95.047,220.878 95.123,220.878 ; 95.047,220.904 95.123,220.904 ; 95.047,220.929 95.148,220.929 ; 95.047,220.955 95.148,220.955 ; 95.047,220.98 95.148,220.98 ; 95.047,221.005 95.148,221.005 ; 95.047,221.031 95.174,221.031 ; 95.047,221.056 95.174,221.056 ; 95.047,221.082 95.174,221.082 ; 95.047,221.107 95.174,221.107 ; 95.047,221.132 95.174,221.132 ; 95.047,221.158 95.174,221.158 ; 95.047,221.183 95.174,221.183 ; 95.047,221.209 95.174,221.209 ; 95.047,221.234 95.174,221.234 ; 95.047,221.259 95.174,221.259 ; 95.047,221.285 95.174,221.285 ; 95.047,221.31 95.174,221.31 ; 95.047,221.336 95.148,221.336 ; 95.072,105.842 95.479,105.842 ; 95.072,105.867 95.682,105.867 ; 95.072,105.893 95.682,105.893 ; 95.072,105.918 95.504,105.918 ; 95.072,106.121 95.479,106.121 ; 95.072,106.147 95.479,106.147 ; 95.072,106.172 95.479,106.172 ; 95.072,106.248 95.479,106.248 ; 95.072,106.274 95.479,106.274 ; 95.072,106.299 95.479,106.299 ; 95.072,106.477 95.479,106.477 ; 95.072,106.502 95.199,106.502 ; 95.072,220.726 95.098,220.726 ; 95.098,105.943 95.504,105.943 ; 95.098,105.969 95.479,105.969 ; 95.098,105.994 95.479,105.994 ; 95.098,106.02 95.479,106.02 ; 95.098,106.045 95.479,106.045 ; 95.098,106.07 95.479,106.07 ; 95.098,106.096 95.479,106.096 ; 95.098,106.528 95.174,106.528 ; 95.098,106.553 95.174,106.553 ; 95.174,221.488 96.342,221.488 ; 95.174,221.513 96.342,221.513 ; 95.174,221.539 96.342,221.539 ; 95.174,221.564 96.342,221.564 ; 95.199,108.458 95.402,108.458 ; 95.199,221.463 95.834,221.463 ; 95.199,221.59 96.342,221.59 ; 95.199,221.894 96.291,221.894 ; 95.225,106.502 95.479,106.502 ; 95.225,106.528 95.479,106.528 ; 95.225,106.553 95.479,106.553 ; 95.225,106.578 95.479,106.578 ; 95.225,106.604 95.479,106.604 ; 95.225,106.629 95.479,106.629 ; 95.225,106.655 95.479,106.655 ; 95.225,108.433 95.301,108.433 ; 95.225,221.285 95.783,221.285 ; 95.225,221.31 95.783,221.31 ; 95.225,221.437 95.809,221.437 ; 95.225,221.92 96.266,221.92 ; 95.225,221.945 96.266,221.945 ; 95.225,221.971 96.241,221.971 ; 95.25,106.426 95.479,106.426 ; 95.25,106.451 95.479,106.451 ; 95.25,106.68 95.352,106.68 ; 95.25,106.705 95.352,106.705 ; 95.25,106.731 95.326,106.731 ; 95.25,108.356 95.301,108.356 ; 95.25,108.382 95.301,108.382 ; 95.25,221.259 95.783,221.259 ; 95.25,221.412 95.783,221.412 ; 95.25,221.615 96.342,221.615 ; 95.25,221.869 96.291,221.869 ; 95.275,106.756 95.326,106.756 ; 95.275,106.782 95.326,106.782 ; 95.275,221.234 95.809,221.234 ; 95.275,221.336 95.783,221.336 ; 95.275,221.64 96.342,221.64 ; 95.275,221.666 96.342,221.666 ; 95.275,221.691 96.342,221.691 ; 95.275,221.717 96.317,221.717 ; 95.275,221.818 96.291,221.818 ; 95.275,221.844 96.291,221.844 ; 95.301,221.209 95.809,221.209 ; 95.301,221.361 95.783,221.361 ; 95.301,221.386 95.783,221.386 ; 95.301,221.742 96.317,221.742 ; 95.301,221.767 96.317,221.767 ; 95.301,221.793 96.317,221.793 ; 95.326,221.158 96.012,221.158 ; 95.326,221.183 96.012,221.183 ; 95.352,106.934 95.479,106.934 ; 95.352,106.959 95.479,106.959 ; 95.352,106.985 95.479,106.985 ; 95.352,107.01 95.479,107.01 ; 95.352,221.132 95.783,221.132 ; 95.377,106.68 95.479,106.68 ; 95.377,106.705 95.479,106.705 ; 95.377,106.731 95.479,106.731 ; 95.377,106.756 95.479,106.756 ; 95.377,106.782 95.479,106.782 ; 95.377,106.807 95.479,106.807 ; 95.377,106.832 95.479,106.832 ; 95.377,106.858 95.479,106.858 ; 95.377,106.883 95.479,106.883 ; 95.377,106.909 95.479,106.909 ; 95.377,107.036 95.479,107.036 ; 95.377,107.061 95.504,107.061 ; 95.377,107.086 95.504,107.086 ; 95.377,107.112 95.479,107.112 ; 95.377,107.137 95.479,107.137 ; 95.377,221.056 95.682,221.056 ; 95.377,221.082 95.58,221.082 ; 95.377,221.107 95.555,221.107 ; 95.402,107.163 95.479,107.163 ; 95.402,218.364 95.86,218.364 ; 95.402,218.389 95.86,218.389 ; 95.402,220.65 95.453,220.65 ; 95.402,220.675 95.453,220.675 ; 95.402,220.701 95.479,220.701 ; 95.402,220.726 95.479,220.726 ; 95.402,220.751 95.504,220.751 ; 95.402,220.955 95.58,220.955 ; 95.402,220.98 95.555,220.98 ; 95.402,221.005 95.555,221.005 ; 95.402,221.031 95.58,221.031 ; 95.428,108.052 95.529,108.052 ; 95.428,108.077 95.529,108.077 ; 95.428,108.407 95.656,108.407 ; 95.428,108.433 95.656,108.433 ; 95.428,218.415 96.368,218.415 ; 95.428,218.44 95.86,218.44 ; 95.428,218.465 95.86,218.465 ; 95.428,218.846 95.86,218.846 ; 95.428,218.872 95.86,218.872 ; 95.428,218.973 95.86,218.973 ; 95.428,218.999 95.86,218.999 ; 95.428,219.024 95.86,219.024 ; 95.428,219.05 95.86,219.05 ; 95.428,219.075 95.606,219.075 ; 95.428,219.1 95.606,219.1 ; 95.428,220.777 95.504,220.777 ; 95.428,220.802 95.555,220.802 ; 95.428,220.828 95.606,220.828 ; 95.428,220.853 95.631,220.853 ; 95.428,220.878 95.656,220.878 ; 95.428,220.904 95.682,220.904 ; 95.428,220.929 95.682,220.929 ; 95.453,108.102 95.555,108.102 ; 95.453,108.128 95.555,108.128 ; 95.453,108.153 95.555,108.153 ; 95.453,108.179 95.555,108.179 ; 95.453,108.255 95.656,108.255 ; 95.453,108.28 95.656,108.28 ; 95.453,108.382 95.656,108.382 ; 95.453,108.458 95.656,108.458 ; 95.453,108.483 95.631,108.483 ; 95.453,108.61 95.631,108.61 ; 95.453,108.636 95.656,108.636 ; 95.453,218.491 95.86,218.491 ; 95.453,218.516 96.063,218.516 ; 95.453,218.542 96.063,218.542 ; 95.453,218.567 95.885,218.567 ; 95.453,218.77 95.86,218.77 ; 95.453,218.796 95.86,218.796 ; 95.453,218.821 95.86,218.821 ; 95.453,218.897 95.86,218.897 ; 95.453,218.923 95.86,218.923 ; 95.453,218.948 95.86,218.948 ; 95.453,219.126 95.86,219.126 ; 95.453,219.151 95.58,219.151 ; 95.479,108.204 95.631,108.204 ; 95.479,108.229 95.656,108.229 ; 95.479,108.306 95.656,108.306 ; 95.479,108.56 95.631,108.56 ; 95.479,108.585 95.631,108.585 ; 95.479,108.661 95.656,108.661 ; 95.479,108.687 95.682,108.687 ; 95.479,108.712 95.707,108.712 ; 95.479,108.737 95.961,108.737 ; 95.479,108.763 95.961,108.763 ; 95.479,108.788 95.961,108.788 ; 95.479,108.814 95.961,108.814 ; 95.479,218.592 95.885,218.592 ; 95.479,218.618 95.86,218.618 ; 95.479,218.643 95.86,218.643 ; 95.479,218.669 95.86,218.669 ; 95.479,218.694 95.86,218.694 ; 95.479,218.719 95.86,218.719 ; 95.479,218.745 95.86,218.745 ; 95.479,219.177 95.555,219.177 ; 95.479,219.202 95.555,219.202 ; 95.504,108.331 95.656,108.331 ; 95.504,108.356 95.656,108.356 ; 95.529,105.715 95.987,105.715 ; 95.529,105.74 95.987,105.74 ; 95.529,105.791 95.987,105.791 ; 95.529,105.816 95.987,105.816 ; 95.529,105.842 95.987,105.842 ; 95.529,105.918 95.656,105.918 ; 95.529,105.943 95.656,105.943 ; 95.529,105.969 95.656,105.969 ; 95.529,105.994 95.656,105.994 ; 95.529,106.02 95.656,106.02 ; 95.529,106.045 95.656,106.045 ; 95.529,106.07 95.682,106.07 ; 95.529,106.096 95.682,106.096 ; 95.529,106.121 95.682,106.121 ; 95.529,106.147 95.682,106.147 ; 95.529,106.172 95.707,106.172 ; 95.529,106.197 95.707,106.197 ; 95.529,106.807 95.656,106.807 ; 95.529,106.832 95.656,106.832 ; 95.529,106.858 95.656,106.858 ; 95.529,106.883 95.631,106.883 ; 95.529,106.909 95.631,106.909 ; 95.529,106.934 95.631,106.934 ; 95.529,106.959 95.631,106.959 ; 95.529,106.985 95.631,106.985 ; 95.529,107.01 95.631,107.01 ; 95.555,106.223 95.707,106.223 ; 95.555,106.248 95.707,106.248 ; 95.555,106.274 95.707,106.274 ; 95.555,106.299 95.682,106.299 ; 95.555,106.324 95.682,106.324 ; 95.555,106.35 95.682,106.35 ; 95.555,106.375 95.682,106.375 ; 95.555,106.401 95.682,106.401 ; 95.555,106.426 95.682,106.426 ; 95.555,106.451 95.682,106.451 ; 95.555,106.477 95.656,106.477 ; 95.555,106.502 95.656,106.502 ; 95.555,106.528 95.682,106.528 ; 95.555,106.553 95.682,106.553 ; 95.555,106.578 95.682,106.578 ; 95.555,106.604 95.682,106.604 ; 95.555,106.629 95.682,106.629 ; 95.555,106.655 95.682,106.655 ; 95.555,106.68 95.656,106.68 ; 95.555,106.705 95.656,106.705 ; 95.555,106.731 95.656,106.731 ; 95.555,106.756 95.656,106.756 ; 95.555,106.782 95.656,106.782 ; 95.555,107.036 95.631,107.036 ; 95.555,107.061 95.631,107.061 ; 95.555,107.086 95.606,107.086 ; 95.58,107.112 95.606,107.112 ; 95.58,107.137 95.606,107.137 ; 95.58,107.163 95.606,107.163 ; 95.58,108.179 95.606,108.179 ; 95.58,221.107 95.783,221.107 ; 95.606,219.151 95.86,219.151 ; 95.606,219.177 95.86,219.177 ; 95.606,219.202 95.86,219.202 ; 95.606,219.227 95.86,219.227 ; 95.606,219.253 95.86,219.253 ; 95.606,219.278 95.86,219.278 ; 95.606,219.304 95.86,219.304 ; 95.606,221.082 95.682,221.082 ; 95.631,219.075 95.86,219.075 ; 95.631,219.1 95.86,219.1 ; 95.631,219.329 95.733,219.329 ; 95.631,219.354 95.733,219.354 ; 95.631,219.38 95.707,219.38 ; 95.631,221.005 95.682,221.005 ; 95.631,221.031 95.682,221.031 ; 95.656,219.405 95.707,219.405 ; 95.656,219.431 95.707,219.431 ; 95.707,105.943 95.987,105.943 ; 95.707,105.969 95.987,105.969 ; 95.707,105.994 95.987,105.994 ; 95.707,106.02 95.987,106.02 ; 95.733,105.867 95.987,105.867 ; 95.733,105.893 95.987,105.893 ; 95.733,105.918 95.987,105.918 ; 95.733,106.045 95.987,106.045 ; 95.733,106.07 95.987,106.07 ; 95.733,108.102 95.834,108.102 ; 95.733,108.128 95.834,108.128 ; 95.733,108.229 95.885,108.229 ; 95.733,108.306 95.91,108.306 ; 95.733,108.331 95.91,108.331 ; 95.733,108.433 95.936,108.433 ; 95.733,108.458 95.961,108.458 ; 95.733,108.483 95.961,108.483 ; 95.733,108.712 95.961,108.712 ; 95.733,219.583 95.86,219.583 ; 95.733,219.608 95.86,219.608 ; 95.733,219.634 95.86,219.634 ; 95.733,219.659 95.86,219.659 ; 95.758,108.026 95.783,108.026 ; 95.758,108.052 95.809,108.052 ; 95.758,108.077 95.834,108.077 ; 95.758,108.153 95.86,108.153 ; 95.758,108.179 95.86,108.179 ; 95.758,108.204 95.885,108.204 ; 95.758,108.255 95.91,108.255 ; 95.758,108.28 95.91,108.28 ; 95.758,108.356 95.936,108.356 ; 95.758,108.382 95.936,108.382 ; 95.758,108.407 95.936,108.407 ; 95.758,108.509 95.961,108.509 ; 95.758,108.534 95.86,108.534 ; 95.758,108.56 95.834,108.56 ; 95.758,108.585 95.86,108.585 ; 95.758,108.61 95.86,108.61 ; 95.758,108.636 95.86,108.636 ; 95.758,108.661 95.885,108.661 ; 95.758,108.687 95.961,108.687 ; 95.758,219.329 95.86,219.329 ; 95.758,219.354 95.86,219.354 ; 95.758,219.38 95.86,219.38 ; 95.758,219.405 95.86,219.405 ; 95.758,219.431 95.86,219.431 ; 95.758,219.456 95.86,219.456 ; 95.758,219.481 95.86,219.481 ; 95.758,219.507 95.86,219.507 ; 95.758,219.532 95.86,219.532 ; 95.758,219.558 95.86,219.558 ; 95.758,219.685 95.86,219.685 ; 95.758,219.71 95.885,219.71 ; 95.758,219.735 95.885,219.735 ; 95.758,219.761 95.86,219.761 ; 95.758,219.786 95.86,219.786 ; 95.783,106.096 95.987,106.096 ; 95.783,219.812 95.86,219.812 ; 95.809,220.701 95.91,220.701 ; 95.809,220.726 95.91,220.726 ; 95.809,221.056 96.037,221.056 ; 95.809,221.082 96.037,221.082 ; 95.834,106.121 95.987,106.121 ; 95.834,220.751 95.936,220.751 ; 95.834,220.777 95.936,220.777 ; 95.834,220.802 95.936,220.802 ; 95.834,220.828 95.936,220.828 ; 95.834,220.904 96.037,220.904 ; 95.834,220.929 96.037,220.929 ; 95.834,221.031 96.037,221.031 ; 95.834,221.107 96.037,221.107 ; 95.834,221.132 96.012,221.132 ; 95.834,221.259 96.012,221.259 ; 95.834,221.285 96.037,221.285 ; 95.86,106.147 95.987,106.147 ; 95.86,106.172 95.987,106.172 ; 95.86,220.853 96.012,220.853 ; 95.86,220.878 96.037,220.878 ; 95.86,220.955 96.037,220.955 ; 95.86,221.209 96.012,221.209 ; 95.86,221.234 96.012,221.234 ; 95.86,221.31 96.037,221.31 ; 95.86,221.336 96.063,221.336 ; 95.86,221.361 96.088,221.361 ; 95.86,221.386 96.342,221.386 ; 95.86,221.412 96.342,221.412 ; 95.86,221.437 96.342,221.437 ; 95.86,221.463 96.342,221.463 ; 95.885,106.197 95.987,106.197 ; 95.885,106.223 95.961,106.223 ; 95.885,106.477 95.961,106.477 ; 95.885,108.534 95.961,108.534 ; 95.885,108.56 95.961,108.56 ; 95.885,108.585 95.961,108.585 ; 95.885,108.61 95.961,108.61 ; 95.885,220.98 96.037,220.98 ; 95.885,221.005 96.037,221.005 ; 95.91,106.248 95.961,106.248 ; 95.91,106.274 95.961,106.274 ; 95.91,106.299 95.961,106.299 ; 95.91,106.324 95.961,106.324 ; 95.91,106.35 95.961,106.35 ; 95.91,106.375 95.961,106.375 ; 95.91,106.401 95.961,106.401 ; 95.91,106.426 95.961,106.426 ; 95.91,106.451 95.961,106.451 ; 95.91,106.502 95.961,106.502 ; 95.91,106.528 95.961,106.528 ; 95.91,106.553 95.961,106.553 ; 95.91,106.578 95.961,106.578 ; 95.91,106.604 95.961,106.604 ; 95.91,106.629 95.961,106.629 ; 95.91,108.636 95.961,108.636 ; 95.91,108.661 95.961,108.661 ; 95.91,218.364 96.368,218.364 ; 95.91,218.389 96.368,218.389 ; 95.91,218.44 96.368,218.44 ; 95.91,218.465 96.368,218.465 ; 95.91,218.491 96.368,218.491 ; 95.91,218.567 96.037,218.567 ; 95.91,218.592 96.037,218.592 ; 95.91,218.618 96.037,218.618 ; 95.91,218.643 96.037,218.643 ; 95.91,218.669 96.037,218.669 ; 95.91,218.694 96.037,218.694 ; 95.91,218.719 96.063,218.719 ; 95.91,218.745 96.063,218.745 ; 95.91,218.77 96.063,218.77 ; 95.91,218.796 96.063,218.796 ; 95.91,218.821 96.088,218.821 ; 95.91,218.846 96.088,218.846 ; 95.91,219.456 96.037,219.456 ; 95.91,219.481 96.037,219.481 ; 95.91,219.507 96.037,219.507 ; 95.91,219.532 96.012,219.532 ; 95.91,219.558 96.012,219.558 ; 95.91,219.583 96.012,219.583 ; 95.91,219.608 96.012,219.608 ; 95.91,219.634 96.012,219.634 ; 95.91,219.659 96.012,219.659 ; 95.936,218.872 96.088,218.872 ; 95.936,218.897 96.088,218.897 ; 95.936,218.923 96.088,218.923 ; 95.936,218.948 96.063,218.948 ; 95.936,218.973 96.063,218.973 ; 95.936,218.999 96.063,218.999 ; 95.936,219.024 96.063,219.024 ; 95.936,219.05 96.063,219.05 ; 95.936,219.075 96.063,219.075 ; 95.936,219.1 96.063,219.1 ; 95.936,219.126 96.037,219.126 ; 95.936,219.151 96.037,219.151 ; 95.936,219.177 96.063,219.177 ; 95.936,219.202 96.063,219.202 ; 95.936,219.227 96.063,219.227 ; 95.936,219.253 96.063,219.253 ; 95.936,219.278 96.063,219.278 ; 95.936,219.304 96.063,219.304 ; 95.936,219.329 96.037,219.329 ; 95.936,219.354 96.037,219.354 ; 95.936,219.38 96.037,219.38 ; 95.936,219.405 96.037,219.405 ; 95.936,219.431 96.037,219.431 ; 95.936,219.685 96.012,219.685 ; 95.936,219.71 96.012,219.71 ; 95.936,219.735 95.987,219.735 ; 95.961,219.761 95.987,219.761 ; 95.961,219.786 95.987,219.786 ; 95.961,219.812 95.987,219.812 ; 95.961,220.828 95.987,220.828 ; 96.088,218.592 96.368,218.592 ; 96.088,218.618 96.368,218.618 ; 96.088,218.643 96.368,218.643 ; 96.088,218.669 96.368,218.669 ; 96.114,218.516 96.368,218.516 ; 96.114,218.542 96.368,218.542 ; 96.114,218.567 96.368,218.567 ; 96.114,218.694 96.368,218.694 ; 96.114,218.719 96.368,218.719 ; 96.114,220.751 96.215,220.751 ; 96.114,220.777 96.215,220.777 ; 96.114,220.878 96.266,220.878 ; 96.114,220.955 96.291,220.955 ; 96.114,220.98 96.291,220.98 ; 96.114,221.082 96.317,221.082 ; 96.114,221.107 96.342,221.107 ; 96.114,221.132 96.342,221.132 ; 96.114,221.361 96.342,221.361 ; 96.139,220.675 96.164,220.675 ; 96.139,220.701 96.19,220.701 ; 96.139,220.726 96.215,220.726 ; 96.139,220.802 96.241,220.802 ; 96.139,220.828 96.241,220.828 ; 96.139,220.853 96.266,220.853 ; 96.139,220.904 96.291,220.904 ; 96.139,220.929 96.291,220.929 ; 96.139,221.005 96.317,221.005 ; 96.139,221.031 96.317,221.031 ; 96.139,221.056 96.317,221.056 ; 96.139,221.158 96.342,221.158 ; 96.139,221.183 96.241,221.183 ; 96.139,221.209 96.215,221.209 ; 96.139,221.234 96.241,221.234 ; 96.139,221.259 96.241,221.259 ; 96.139,221.285 96.241,221.285 ; 96.139,221.31 96.266,221.31 ; 96.139,221.336 96.342,221.336 ; 96.164,218.745 96.368,218.745 ; 96.215,218.77 96.368,218.77 ; 96.241,218.796 96.368,218.796 ; 96.241,218.821 96.368,218.821 ; 96.266,218.846 96.368,218.846 ; 96.266,218.872 96.342,218.872 ; 96.266,219.126 96.342,219.126 ; 96.266,221.183 96.342,221.183 ; 96.266,221.209 96.342,221.209 ; 96.266,221.234 96.342,221.234 ; 96.266,221.259 96.342,221.259 ; 96.291,106.451 96.393,106.451 ; 96.291,106.477 96.368,106.477 ; 96.291,106.502 96.368,106.502 ; 96.291,106.528 96.368,106.528 ; 96.291,218.897 96.342,218.897 ; 96.291,218.923 96.342,218.923 ; 96.291,218.948 96.342,218.948 ; 96.291,218.973 96.342,218.973 ; 96.291,218.999 96.342,218.999 ; 96.291,219.024 96.342,219.024 ; 96.291,219.05 96.342,219.05 ; 96.291,219.075 96.342,219.075 ; 96.291,219.1 96.342,219.1 ; 96.291,219.151 96.342,219.151 ; 96.291,219.177 96.342,219.177 ; 96.291,219.202 96.342,219.202 ; 96.291,219.227 96.342,219.227 ; 96.291,219.253 96.342,219.253 ; 96.291,219.278 96.342,219.278 ; 96.291,221.285 96.342,221.285 ; 96.291,221.31 96.342,221.31 ; 96.317,106.375 96.393,106.375 ; 96.317,106.401 96.393,106.401 ; 96.317,106.426 96.393,106.426 ; 96.342,106.299 96.393,106.299 ; 96.342,106.324 96.393,106.324 ; 96.342,106.35 96.393,106.35 ; 96.368,106.197 96.418,106.197 ; 96.368,106.223 96.418,106.223 ; 96.368,106.248 96.418,106.248 ; 96.368,106.274 96.393,106.274 ; 96.368,108.433 96.571,108.433 ; 96.368,108.458 96.571,108.458 ; 96.368,108.483 96.825,108.483 ; 96.368,108.509 96.825,108.509 ; 96.368,108.534 98.222,108.534 ; 96.368,108.56 98.171,108.56